# Altium PCB TYPEC_4KTransmitter-v1.0.PcbDoc (part 5 of 12)
Units mil, origin at the board's own origin, x right, y up, seen from the top; angles counter-clockwise.
Board outline 2834.7 x 1259.84 mil, 10 copper layers (Top Layer, GND-1, Signal L1, GND-2, PWR-1, PWR-2, GND-3, Signal L2, GND-4, Bottom Layer), stack 61.686 mil thick; 475 components, 338 nets, 2161 pads, 1240 vias.
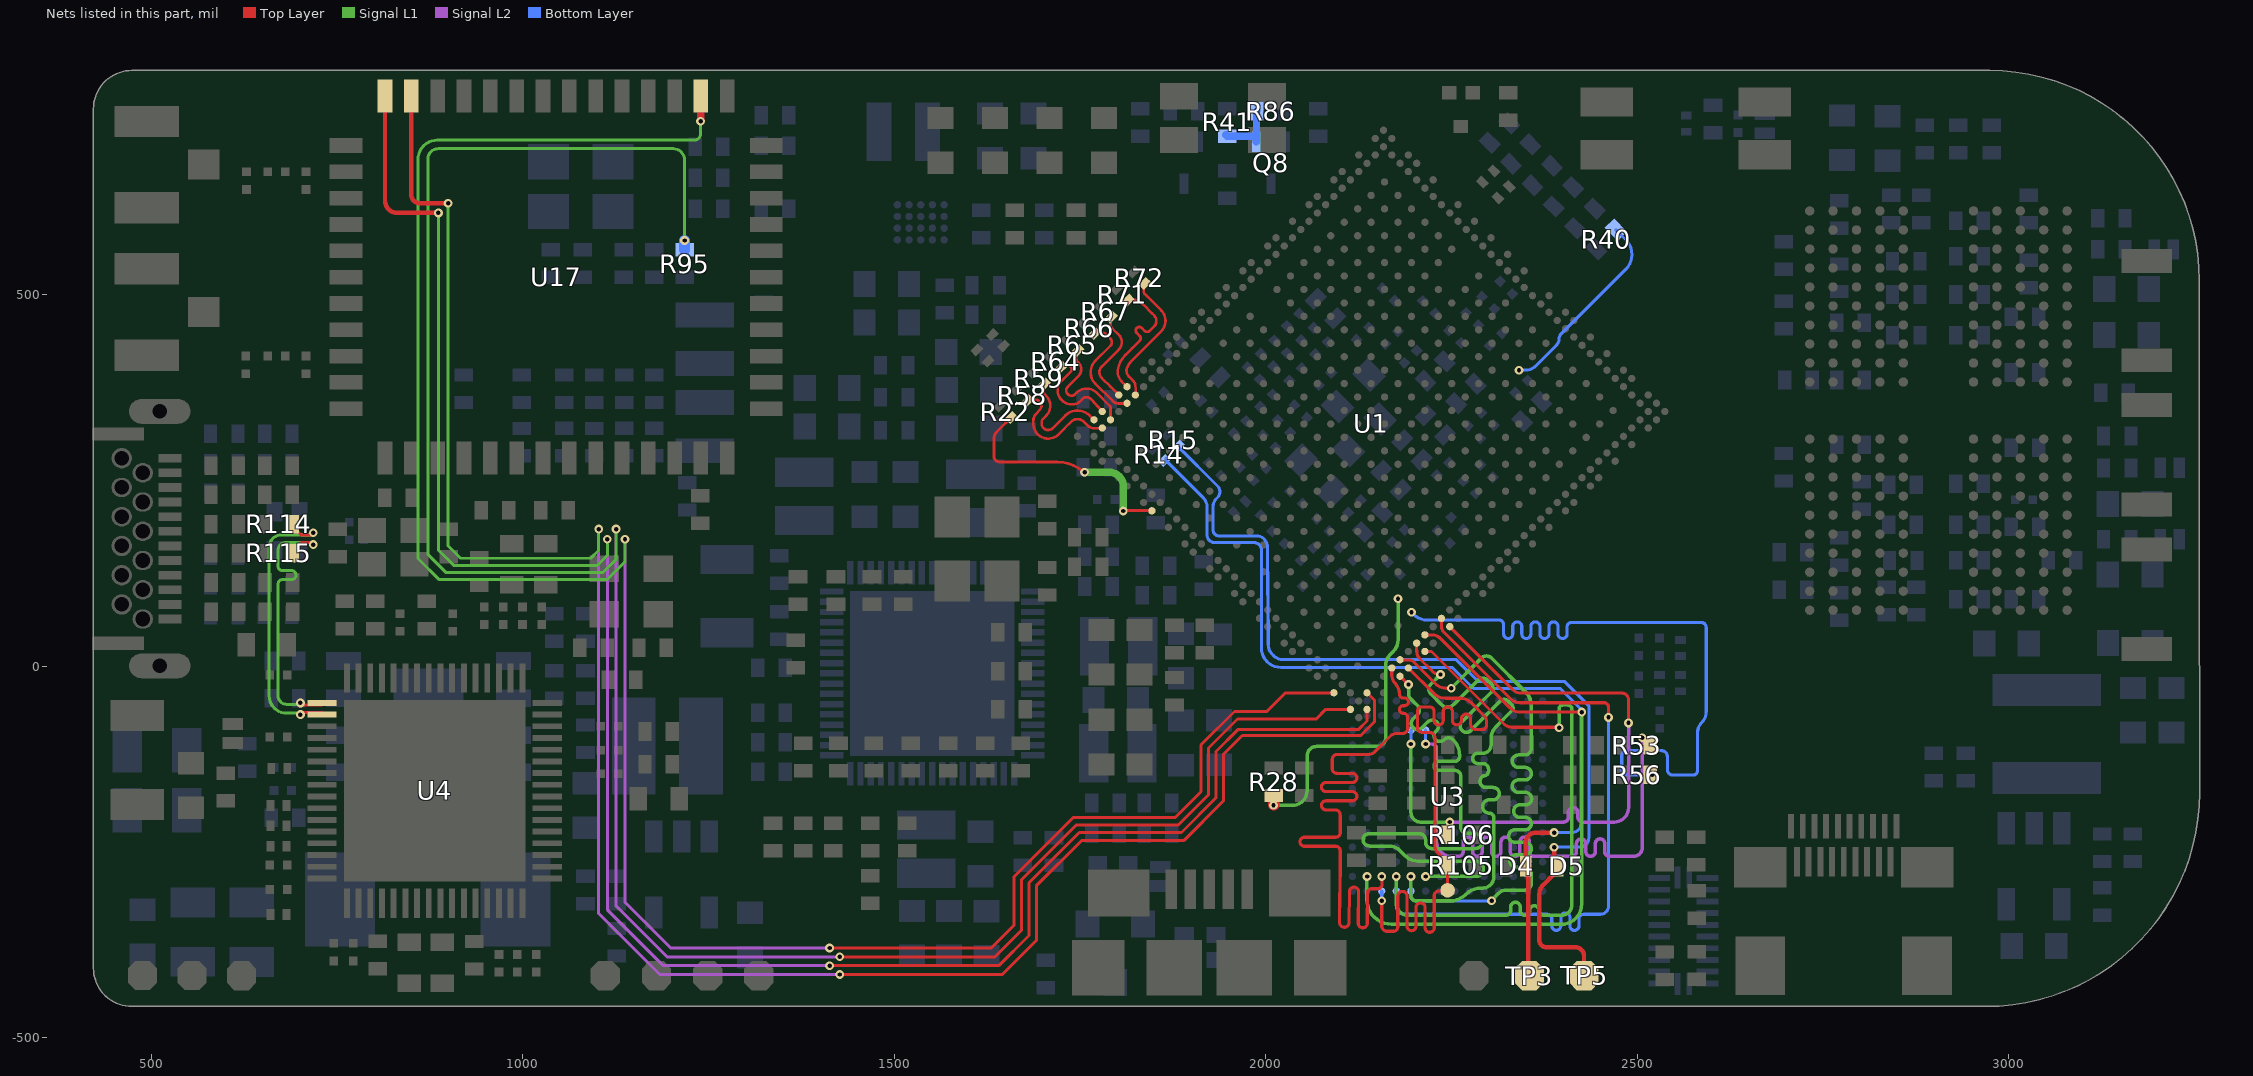
[diagram p11: the nets of this part, all layers, seen from the top]

## Part data (continued)
R135 R136 R137 R138 R139: library part RC0402FR-0730KL, "RES 30K OHM 1% 1/16W 0402", Case Code (Imperial)=0402, Case Code (Metric)=1005, Manufacturer=Yageo, Max Operating Temperature=155°C, Max Power Dissipation=63mW, Min Operating Temperature=-55°C, Power Rating=62.5mW, Resistance=30kR, Resistance Tolerance=1%, Resistor Type="Thick Film", Supplier Part Number 1=603-RC0402FR-0730KL, Temperature Coefficient=100ppm/°C, Voltage Rating=50V, Case/Package=0402, Category="Chip SMD Resistors", ComponentLink1Description=https://datasheet.ciiva.com/7849/1018594-7849957.pdf?src-supplier=Element14, ComponentLink1URL=https://datasheet.ciiva.com/7849/1018594-7849957.pdf?src-supplier=Element14, ComponentLink2Description=https://datasheet.ciiva.com/46394/1018594-46394938.pdf?src-supplier=Element14, ComponentLink2URL=https://datasheet.ciiva.com/46394/1018594-46394938.pdf?src-supplier=Element14, ComponentLink3Description=https://datasheet.ciiva.com/12577/pyu-rc0402-51-rohs-l-6-r-12577743.pdf?src-supplier=Mouser, ComponentLink3URL=https://datasheet.ciiva.com/12577/pyu-rc0402-51-rohs-l-6-r-12577743.pdf?src-supplier=Mouser, Construction=Rectangular, Depth=0.5mm, Features="Moisture Resistant", Height=0.35mm, Lead Free="Lead Free", Length=1mm, Manufacturer Part Number=RC0402FR-0730KL, Military Standard=Not, Number of Terminations=2, Packaging="Tape and Reel", Pricing 1="1=0.10000, 10=0.01200, 50=0.01200, 100=0.00500, 1000=0.00300, 2500=0.00200, 10000=0.00100 (USD)", REACH SVHC=Unknown, RoHS=Yes, RoHS Compliant=Yes, Series=RC, Size Code=0402, Stock 1=684954, Supplier 1=Mouser, Termination=SMD/SMT, Tolerance=1%, Voltage Rating (DC)=50V, Weight=2.3E-05oz, Width=0.5mm
SW1 SW2 SW3: "SWITCH TACTILE SPST-NO 0.05A 12V", Contact Current Rating=50mA, Contact Resistance=100mR, Insulation Resistance=100MR, LCSC Part Number=C231329, Manufacturer=Omron, Max Operating Temperature=70°C, Max Voltage Rating (DC)=12V, Min Operating Temperature=-25°C, Operating Force=1.5N, Package Quantity=1, Ratings="Dust Proof,IP40", Supplier Part Number 1=SW1020DKR-ND, Actuator Length=0.4mm, Actuator Type=Standard, ComponentLink1Description=http://www.farnell.com/datasheets/60838.pdf?src-supplier=Farnell, ComponentLink1URL=http://www.farnell.com/datasheets/60838.pdf?src-supplier=Farnell, ComponentLink2Description=http://www.farnell.com/datasheets/60838.pdf?src-supplier=Element14, ComponentLink2URL=http://www.farnell.com/datasheets/60838.pdf?src-supplier=Element14, ComponentLink3Description=https://omronfs.omron.com/en_US/ecb/products/pdf/en-b3u.pdf?src-supplier=Digi-Key, ComponentLink3URL=https://omronfs.omron.com/en_US/ecb/products/pdf/en-b3u.pdf?src-supplier=Digi-Key, ComponentLink4Description=http://www.omron.com/ecb/products/pdf/en-b3u.pdf?src-supplier=Digi-Key, ComponentLink4URL=http://www.omron.com/ecb/products/pdf/en-b3u.pdf?src-supplier=Digi-Key, ComponentLink5Description=https://www.distrelec.biz/Web/Downloads/he/et/B3U_eng_datasheet.pdf?mime=application%2Fpdf&src-supplier=Distrelec, ComponentLink5URL=https://www.distrelec.biz/Web/Downloads/he/et/B3U_eng_datasheet.pdf?mime=application%2Fpdf&src-supplier=Distrelec, ComponentLink6Description=http://www.onlinecomponents.com/productFiles/mf-OM/en-b3u.pdf?src-supplier=Onlinecomponents.com, ComponentLink6URL=http://www.onlinecomponents.com/productFiles/mf-OM/en-b3u.pdf?src-supplier=Onlinecomponents.com, ComponentLink7Description=https://www.verical.com/server-webapp/html/getDatasheet?partID=552554&src-supplier=Verical, ComponentLink7URL=https://www.verical.com/server-webapp/html/getDatasheet?partID=552554&src-supplier=Verical, ComponentLink8Description=http://www.farnell.com/datasheets/1685550.pdf?src-supplier=Element14, ComponentLink8URL=http://www.farnell.com/datasheets/1685550.pdf?src-supplier=Element14, ComponentLink9Description=http://www.farnell.com/datasheets/2610940.pdf?src-supplier=Farnell, ComponentLink9URL=http://www.farnell.com/datasheets/2610940.pdf?src-supplier=Farnell, ComponentLink10Description=https://www.alliedelec.com/m/d/4c8a9ef82804fc3c241a13c1e298fd73.pdf?src-supplier=Allied+Electronics, ComponentLink10URL=https://www.alliedelec.com/m/d/4c8a9ef82804fc3c241a13c1e298fd73.pdf?src-supplier=Allied+Electronics, Contact Material=Silver, Current Rating=50mA, Depth=2.5mm, Electrical Life=200000Cycles, Height=1.2mm, Illumination Type=Non-Illuminated,Illuminated, Item Type=Switch, Lead Free="Lead Free", Length=4mm, Manufacturer Part Number=B3U-1000P, Max Current Rating=50mA, Mechanical Life=200000Cycles, Mount="Surface Mount", Orientation=Straight, Packaging="Tape and Reel", Pricing 1="1=1, 10=0.961, 25=0.9064, 50=0.7976, 100=0.7251, 250=0.68888, 500=0.67074, 1000=0.52571 (USD)", REACH SVHC=Unknown, Stock 1=116454, Supplier 1=Digi-Key, Switch Function=Off-Mom, Switch Travel=0.15mm, Termination=SMD/SMT, Throw Configuration=SPST, Voltage Rating (DC)=12V, Weight=0.000776oz, Width=3mm
SW4: "SWITCH TACTILE SPST-NO 0.05A 12V", Actuator Color=Black, Contact Current Rating=50mA, Contact Resistance=500mR, LCSC Part Number=C128539, Manufacturer=Panasonic, Max Operating Temperature=70°C, Max Voltage Rating (DC)=12V, Min Operating Temperature=-20°C, Operating Force=2.2N, Package Quantity=4000, Actuator Length=1mm, Category="Tactile Switches", ComponentLink1Description=https://datasheet.ciiva.com/30117/atv0000ce5-30117313.pdf?src-supplier=Onlinecomponents.com, ComponentLink1URL=https://datasheet.ciiva.com/30117/atv0000ce5-30117313.pdf?src-supplier=Onlinecomponents.com, ComponentLink2Description=https://datasheet.ciiva.com/26945/getdatasheetpartid-65575-26945772.pdf?src-supplier=Verical, ComponentLink2URL=https://datasheet.ciiva.com/26945/getdatasheetpartid-65575-26945772.pdf?src-supplier=Verical, ComponentLink3Description=https://datasheet.ciiva.com/7987/1679731-7987639.pdf?src-supplier=Element14, ComponentLink3URL=https://datasheet.ciiva.com/7987/1679731-7987639.pdf?src-supplier=Element14, ComponentLink4Description=https://datasheet.ciiva.com/8165/atv0000ce5-8165244.pdf?src-supplier=Avnet, ComponentLink4URL=https://datasheet.ciiva.com/8165/atv0000ce5-8165244.pdf?src-supplier=Avnet, ComponentLink5Description=https://datasheet.ciiva.com/2899/atv0000ce5-2899804.pdf?src-supplier=Digikey, ComponentLink5URL=https://datasheet.ciiva.com/2899/atv0000ce5-2899804.pdf?src-supplier=Digikey, ComponentLink6Description=https://datasheet.ciiva.com/2899/atv0000ce5-2899805.pdf?src-supplier=Digikey, ComponentLink6URL=https://datasheet.ciiva.com/2899/atv0000ce5-2899805.pdf?src-supplier=Digikey, ComponentLink7Description=https://datasheet.ciiva.com/2899/atv0000ce5-2899803.pdf?src-supplier=Digikey, ComponentLink7URL=https://datasheet.ciiva.com/2899/atv0000ce5-2899803.pdf?src-supplier=Digikey, Current Rating=50mA, Depth=4.5mm, Electrical Life=100000Cycles, Illumination Type=Non-Illuminated,Illuminated, Item Type="Tactile Switch", Length=6.4mm, Manufacturer Part Number=EVQ-PUA02K, Max Current Rating=50mA, Mechanical Life=100000Cycles, Mounting Technology="Surface Mount", Number of Positions=2NUMBER, Orientation=Straight, Packaging="Tape and Reel", Pricing="1=0.52, 10=0.461, 50=0.461, 100=0.384, 1000=0.335, 10000=0.283 (USD)", Radiation Hardening=No, RoHS=Yes, RoHS Compliant=Yes, Series=EVQPU, Stock=6621, Supplier=Mouser, Switch Function=Off-Mom, Switch Travel=0.3mm, Termination="Gull Wing", Throw Configuration=SPST, Voltage Rating (DC)=12V
TP1 TP2 TP3 TP5 TP6 TP7 TP10 TP11 TP12 TP14: "Test Point ON", Item Type="Test Point", Manufacturer Part Number="TEST POINT 0.5mm Dia"
U1: "BGA-565(15.5x14.4) Microcontrollers (MCU/MPU/SOC) ROHS", LCSC Part Number=C2943786, Manufacturer=Rockchip, Package=BGA-565(15.5x14.4), ComponentLink1Description=LCSC, ComponentLink1URL=https://www.lcsc.com/product-detail/Microcontrollers-MCU-MPU-SOC_Rockchip-RK3566_C2943786.html, Item Type=IC, Manufacturer Part Number=RK3566
U2: "IC INTERFACE SPECIALIZED 24UQFN", Manufacturer="Texas Instruments", Supplier Part Number=595-TPD12S016RKTR, Category="Interface ICs", ComponentLink1Description=https://datasheet.ciiva.com/12545/tpd12s016-108314-12545332.pdf?src-supplier=Mouser, ComponentLink1URL=https://datasheet.ciiva.com/12545/tpd12s016-108314-12545332.pdf?src-supplier=Mouser, ComponentLink2Description=https://datasheet.ciiva.com/14195/tpd12s016-14195158.pdf?src-supplier=Avnet, ComponentLink2URL=https://datasheet.ciiva.com/14195/tpd12s016-14195158.pdf?src-supplier=Avnet, ComponentLink3Description=https://datasheet.ciiva.com/6632/tpd12s016-6632086.pdf?src-supplier=Digikey, ComponentLink3URL=https://datasheet.ciiva.com/6632/tpd12s016-6632086.pdf?src-supplier=Digikey, Manufacturer Part Number=TPD12S016RKTR, Pricing="1=0.82, 10=0.694, 50=0.694, 100=0.537, 1000=0.443, 10000=0.442 (USD)", RoHS=Yes, Stock=5223, Supplier=Mouser
U3: "eMMC 5.1 FBGA-153 eMMC ROHS", LCSC Part Number=C499919, Manufacturer=Samsung, Package=FBGA-153, ComponentLink1Description=LCSC, ComponentLink1URL=https://www.lcsc.com/product-detail/eMMC_Samsung-KLMAG1JETD-B041_C499919.html, Item Type=IC, Manufacturer Part Number=KLMAG1JETD-B041
U4: "5.4Gbps Type-C/DP/eDPToDual-port MIPI DSI/CSI/LVDS with Audio QFN-64(7.5x7.5) Video Interface ICs ROHS", LCSC Part Number=C5310990, Manufacturer="LONTIUM SEMICONDUCTOR", Package=QFN-64(7.5x7.5), ComponentLink1Description=LCSC, ComponentLink1URL=https://jlcpcb.com/partdetail/LontiumSemiconductor-LT7911D/C5310990, Item Type=IC, Manufacturer Part Number=LT7911D
U5: "Step-down type CSP1.56*1.96-20 DC-DC Converters ROHS", LCSC Part Number=C178249, Manufacturer=Silergy, Manufacturer Part Number=SYR838PKC, RoHS=Yes, Supplier 1=Avnet, Supplier Part Number 1=SYR838PKC
U6: "Step-down type 3.8V~36V 5A ESOP-8 DC-DC Converters ROHS", LCSC Part Number=C509400, Manufacturer=SCT, Item Type=IC, Manufacturer Part Number=SCT2450STER, RoHS=No, Supplier=LCSC
U7: "QFN-68-EP(7x7) Power Management Specialized - PMIC ROHS", LCSC Part Number=C2939628, Manufacturer=Rockchip, Package=QFN-68-EP(7x7), ComponentLink1Description=LCSC, ComponentLink1URL=https://www.lcsc.com/product-detail/Power-Management-Specialized-PMIC_Rockchip-RK809-5_C2939628.html, Item Type=IC, Manufacturer Part Number=RK809-5
U8: "IC CURRENT SWITCH SOT23-3", LCSC Part Number=C500764, Manufacturer=Diodes, Supplier Part Number=AP2331SA-7DICT-ND, Category="Hot Swap Controllers", ComponentLink1Description=https://datasheet.ciiva.com/15108/getdatasheetpartid-670771-15108880.pdf?src-supplier=Verical, ComponentLink1URL=https://datasheet.ciiva.com/15108/getdatasheetpartid-670771-15108880.pdf?src-supplier=Verical, ComponentLink2Description=https://datasheet.ciiva.com/4923/ap2331-6844-4923636.pdf?src-supplier=Mouser, ComponentLink2URL=https://datasheet.ciiva.com/4923/ap2331-6844-4923636.pdf?src-supplier=Mouser, ComponentLink3Description=https://datasheet.ciiva.com/8142/ap2331-8142774.pdf?src-supplier=Avnet, ComponentLink3URL=https://datasheet.ciiva.com/8142/ap2331-8142774.pdf?src-supplier=Avnet, ComponentLink4Description=https://datasheet.ciiva.com/1962/ap2331-1962167.pdf?src-supplier=Digikey, ComponentLink4URL=https://datasheet.ciiva.com/1962/ap2331-1962167.pdf?src-supplier=Digikey, ComponentLink5Description=https://datasheet.ciiva.com/1962/ap2331-1962168.pdf?src-supplier=Digikey, ComponentLink5URL=https://datasheet.ciiva.com/1962/ap2331-1962168.pdf?src-supplier=Digikey, ComponentLink6Description=https://datasheet.ciiva.com/1962/ap2331-1962169.pdf?src-supplier=Digikey, ComponentLink6URL=https://datasheet.ciiva.com/1962/ap2331-1962169.pdf?src-supplier=Digikey, Item Type=IC, Manufacturer Part Number=AP2331SA-7, Pricing="1=0.45, 10=0.383, 25=0.3572, 100=0.2859, 250=0.26548, 500=0.22464, 1000=0.17359 (USD)", RoHS=Yes, Stock=19607, Supplier=Digikey
U11: "Step-down type SOT-23-5 DC-DC Converters ROHS", LCSC Part Number=C78988, Manufacturer=Silergy, ComponentLink1Description=LCSC, ComponentLink1URL=https://www.lcsc.com/product-detail/DC-DC-Converters_Silergy-Corp-SY8089AAAC_C78988.html, Item Type=IC, Manufacturer Part Number=SY8089AAAC, RoHS=No, Supplier 1=LCSC, Supplier Part Number 1=C78988
U12: "FBGA-200 DDR SDRAM ROHS", LCSC Part Number=C2920249, Manufacturer=Samsung, Item Type=IC, Manufacturer Part Number=K4U6E3S4AA-MGCL, Pricing="1=9.1076, 10=7.9029, 30=7.1674, 128=6.5516 (USD)", RoHS=No, Stock=962, Supplier=LCSC
U16: "IC REG BUCK ADJ 2A SOT23-5", LCSC Part Number=C141836, Manufacturer="Texas Instruments", ComponentLink1Description=http://www.ti.com/lit/ds/symlink/tlv62569.pdf?src-supplier=Farnell, ComponentLink1URL=http://www.ti.com/lit/ds/symlink/tlv62569.pdf?src-supplier=Farnell, ComponentLink2Description=http://www.ti.com/lit/ds/symlink/tlv62569.pdf?src-supplier=Digikey, ComponentLink2URL=http://www.ti.com/lit/ds/symlink/tlv62569.pdf?src-supplier=Digikey, Item Type=IC, Manufacturer Part Number=TLV62569DBVR, Pricing="1=0.47, 10=0.248, 50=0.248, 100=0.143, 1000=0.12, 10000=0.086 (USD)", RoHS=Yes, Stock=6385, Supplier=Mouser
U17: "-86dBm 14dBm 2.4GHz - WiFi Modules ROHS", LCSC Part Number=C2918717, Manufacturer="AMPAK Tech", Package=Custom, ComponentLink1Description=LCSC, ComponentLink1URL=https://www.lcsc.com/product-detail/WiFi-Modules_AMPAK-Tech-AP6275S_C2918717.html, Item Type=Module, Manufacturer Part Number=AP6275S
X1: library part XDMCZLNDDF-0.032768MHZ, "32.768kHz 贴片晶振 12.5pF ±20ppm ±20ppm SMD3215-2P Crystals ROHS", LCSC Part Number=C521573, Manufacturer="TAITIEN Elec", Package=SMD3215-2P, ComponentLink1Description=LCSC, ComponentLink1URL=https://www.lcsc.com/product-detail/Crystals_TAITIEN-Elec-XDMCZLNDDF-0-032768MHZ_C521573.html, Item Type=Crystal, Manufacturer Part Number=XDMCZLNDDF-0.032768MHZ
X2: library part X322524MOB4SI, "24MHz SMD Crystal Resonator 12pF ±10ppm ±30ppm -40℃~+85℃ SMD3225-4P Crystals ROHS", LCSC Part Number=C70590, Manufacturer="Yangxing Tech", ComponentLink1Description=LCSC, ComponentLink1URL=https://www.lcsc.com/product-detail/Crystals_Yangxing-Tech-X322524MOB4SI_C70590.html, Item Type=Crystal, Manufacturer Part Number=X322524MOB4SI
X3: library part Q22FA12800078, "37.4MHz SMD Crystal Resonator 9pF 60Ω ±10ppm -40℃~+85℃ SMD2016-4P Crystals", LCSC Part Number=C255897, Manufacturer=Seiko, ComponentLink1Description=LCSC, ComponentLink1URL=https://www.lcsc.com/product-detail/Crystals_Seiko-Epson-Q22FA12800078_C255897.html, Manufacturer Part Number=Q22FA12800078
X4: library part NX2520SA-27MHZ-STD-CSW-5, "SMD2520-4P Crystals ROHS", Case/Package=SMD/SMT, ESR (Equivalent Series Resistance)=70kR, Frequency=32.768kHz, Frequency Tolerance=20ppm, LCSC Part Number=C910047, Load Capacitance=6pF, Manufacturer=NDK, Max Operating Temperature=85°C, Min Operating Temperature=-40°C, Supplier Part Number 1=1847854, Category=Crystals, Item Type=Crystal, Manufacturer Part Number=NX2520SA-27MHZ-STD-CSW-5, Mounting Technology="Surface Mount", Packaging="Cut Tape", Pricing 1="5=0.15520, 50=0.68600, 100=0.66600, 250=0.65000, 500=0.63400 (GBP)", RoHS=Yes, RoHS Compliant=Yes, Series=NX3215SA, Stock 1=500, Supplier 1=Rs
X5: library part SX3M32.768KD10F20TLN, "1.8V ±10ppm ±20ppm CMOS 32.768kHz SMD3225-4P Crystal Oscillators ROHS", LCSC Part Number=C21547574, Manufacturer="Shenzhen SCTF Elec", Package=SMD3225-4P, ComponentLink1Description=LCSC, ComponentLink1URL=https://www.lcsc.com/product-detail/Crystal-Oscillators_Shenzhen-SCTF-Elec-SX3M32-768KD10F20TLN_C21547574.html, Item Type="Crystal Oscillator", Manufacturer Part Number=SX3M32.768KD10F20TLN

## Free pads (board coordinates)
  round 19.68 smd: 2(2244.94,-301.97)

## Via types
v1: diameter 11.81, hole 5.91, Top Layer to Bottom Layer, tented both sides, 710 vias
v2: diameter 15.75, hole 7.87, Top Layer to Bottom Layer, tented both sides, 265 vias
v3: diameter 11.81, hole 5.91, Top Layer to Signal L1, tented both sides, 146 vias
v4: diameter 11.81, hole 5.91, Signal L2 to Bottom Layer, 60 vias
v5: diameter 11.81, hole 5.91, Signal L1 to Signal L2, 38 vias
v6: diameter 11.81, hole 5.91, Top Layer to Signal L1, 16 vias
v7: diameter 11.81, hole 5.91, Top Layer to Bottom Layer, 4 vias
v8: diameter 11.81, hole 5.91, Signal L1 to Signal L2, tented both sides, 1 vias

## Nets (pads, with @x,y where several pads share a name; then routed paths per layer and width w, separated by ;. In a path a pad name is that pad's centre, name@x,y a point inside that pad or via, vN(x,y) a via of type N, cw(c..) or ccw(c..) an arc to the next point about the centre after c; other vN are vias at no path point)
#HDMI_TX0_N: R67.1 U1.AR33 | length 127.3
  Top Layer w3.5: 1776.83,398.55 ccw(c1787.82,395.15) 1776.33,395.69 ccw(c1787.82,395.15) 1776.32,395.39 ccw(c1787.82,395.15) 1776.32,395.28 ccw(c1786.84,395.28) 1779.4,387.85 1791.73,375.52 1792.26,374.99 ; 1776.92,398.82 cw(c1787.82,395.15) 1779.69,403.29 1802.53,426.13 ccw(c1792.64,436.01) 1806.62,436.01 ccw(c1793.57,436.01) 1802.81,445.23 1794.11,453.93 cw(c1800.9,460.73) 1793.72,454.34 cw(c1800.9,460.73) 1792.27,456.49 cw(c1800.9,460.73) 1791.29,460.73 cw(c1812.56,463.44) 1791.12,463.37 R67.1@1791.12,463.44 ; 1791.02,376.19 U1.AR33@1802.41,364.8
#HDMI_TX0_P: R66.1 U1.AP33 | length 151.6
  Top Layer w3.5: R66.1@1770.01,447.37 1771.4,448.76 1776.44,448.76 1776.53,448.67 1779.8,448.67 cw(c1779.8,440.78) 1785.39,446.36 1791.18,440.57 cw(c1786.42,435.81) 1791.18,431.04 1770.5,410.36 ccw(c1785.22,395.95) 1767.07,405.69 ccw(c1785.22,395.95) 1764.64,395.12 1764.65,394.97 1764.68,394.08 ccw(c1784.16,394.33) 1770.43,380.51 1794.3,356.65 ccw(c1802.41,364.8) 1801.59,353.33 1813.21,353.33 U1.AP33@1813.55,353.66
#HDMI_TX1_N: R65.1 U1.AP35 | length 157.1
  Top Layer w3.5: R65.1@1747.51,424.87 ccw(c1753.13,419.25) 1745.18,419.25 1745.18,414.57 ccw(c1752.91,414.57) 1747.45,409.1 1747.96,408.59 ; 1748.1,408.46 cw(c1738.64,399.33) 1747.77,389.86 1733.5,375.59 ccw(c1738.12,370.89) 1731.53,370.99 ccw(c1738.65,371.11) 1733.56,366.12 ccw(c1739.18,371.65) 1739.02,363.77 ccw(c1739.06,367.27) 1739.31,363.78 ccw(c1738.75,370.58) 1743.57,365.75 1745.79,367.97 cw(c1758.48,355.28) 1758.48,373.22 1760.03,373.22 cw(c1760.03,356.11) 1772.13,368.21 1790.25,350.09 cw(c1787.77,347.61) 1791.27,347.61 U1.AP35@1791.27,331.39
#HDMI_TX1_P: R64.1 U1.AR35 | length 134.2
  Top Layer w3.5: 1720.03,370.66 ccw(c1738.65,371.11) 1725.45,357.97 ; 1720.03,370.89 cw(c1738.12,370.89) 1725.33,383.68 1731.6,389.95 1737.83,396.18 ; R64.1@1725.01,402.37 cw(c1729.45,397.93) 1729.45,404.21 1733.78,404.21 cw(c1733.78,398.33) 1737.94,402.49 cw(c1734.77,399.32) 1739.24,399.6 cw(c1734.41,399.6) 1737.87,396.22 ; 1725.48,357.94 ccw(c1739.2,371.65) 1739.2,352.25 1740.24,352.25 ccw(c1740.24,366.98) 1750.65,356.57 1753.57,359.48 cw(c1758.97,354.09) 1758.97,361.72 cw(c1758.97,353.56) 1763.17,360.56 cw(c1758.97,353.56) 1764.75,359.33 U1.AR35@1780.14,342.53
#HDMI_TX2_N: R59.1 U1.AR36 | length 149.5
  Top Layer w3.5: 1701.45,319.92 cw(c1708.84,327.18) 1699.34,331.29 1704.93,337.35 1705.38,337.82 ccw(c1692.41,350.23) 1705.61,362.39 1704.63,363.46 1702.91,365.32 cw(c1705.47,367.7) 1702.46,365.91 cw(c1710.73,370.74) 1701.16,370.74 1701.16,373.4 1701.12,373.44 1701.12,378.48 R59.1@1702.51,379.87 ; 1701.57,319.82 ccw(c1707.35,326.22) 1711.41,318.61 1712.09,318.97 ccw(c1710.43,322.05) 1712.89,319.56 1730.57,337.24 cw(c1746.58,321.23) 1746.6,343.87 cw(c1746.58,319.87) 1750.65,343.53 1753.02,343.13 cw(c1746.82,320.79) 1763.21,337.18 U1.AR36@1769,331.39
#HDMI_TX2_P: R58.1 U1.AP36 | length 169.3
  Top Layer w3.5: R58.1@1680.01,357.1 1685.05,357.1 1686.54,358.58 1690.35,358.58 cw(c1690.35,351.97) 1695.02,356.65 ; 1695.02,356.65 1696.96,354.71 cw(c1690.49,350.19) 1696.96,345.66 1690.89,339.09 ccw(c1699.34,331.29) 1688.75,335.78 ccw(c1708.84,327.18) 1693.34,311.77 ccw(c1697.4,315.84) 1693.41,311.71 ccw(c1703.93,322.4) 1693.69,311.44 ccw(c1697.65,315.6) 1693.75,311.38 ccw(c1707.35,326.22) 1716.82,308.46 1717.49,308.82 ccw(c1710.43,322.05) 1720.99,311.4 1729.55,319.96 ; 1729.61,320.01 1738.7,329.11 cw(c1746.58,321.23) 1746.58,332.37 cw(c1746.58,319.87) 1755.41,328.72 1758.45,325.68 1760.94,323.19 ccw(c1768.97,331.32) 1768.97,319.89 U1.AP36@1780.14,320.26
#HDMI_TXCLK_N: R72.1 U1.AP32 | length 185.8
  Top Layer w3.5: 1821.6,384.14 1821.3,384.44 1817.02,388.71 1816.18,389.56 cw(c1824.74,398.04) 1812.69,397.61 cw(c1816.19,397.68) 1812.78,398.46 cw(c1837.52,392.55) 1815.79,405.77 cw(c1837.52,392.55) 1819.58,410.58 1859.17,450.17 ccw(c1844.49,464.88) 1865.28,464.86 ccw(c1846.33,464.88) 1859.73,478.29 1840.22,497.79 1837.54,500.47 cw(c1841.68,504.61) 1835.83,504.59 1835.83,508.15 1836.12,508.44 1835.83,508.73 R72.1@1837.51,514.87 ; 1821.62,384.12 cw(c1813.55,375.93) 1821.73,384.01 cw(c1813.55,375.93) 1824.71,378.69 cw(c1821.31,377.87) 1824.8,378.04 1825.04,372.99 cw(c1821.55,372.82) 1825.05,372.82 1825.05,371.17 U1.AP32@1824.68,364.8
#HDMI_TXCLK_P: R71.1 U1.AR32 | length 185.6
  Top Layer w3.5: U1.AR32@1813.55,375.93 1806.18,383.16 cw(c1819.13,396.11) 1800.82,396.11 1800.82,398.21 cw(c1838.25,391.81) 1811.41,418.67 1820.06,427.32 1830.47,437.73 ccw(c1827.11,441.09) 1830.47,444.45 1826.72,448.21 cw(c1830.08,451.56) 1826.72,454.92 cw(c1830.08,451.56) 1833.44,454.92 1837.19,451.17 ccw(c1840.55,454.53) 1843.91,451.17 1850.17,457.43 1850.61,457.9 ccw(c1843.1,464.51) 1851.66,459.33 ccw(c1843.1,464.51) 1851.86,459.69 ccw(c1843.1,464.5) 1850.17,471.58 1847.24,474.5 1835.48,486.27 1835.16,486.59 ccw(c1817.77,468.92) 1821.16,493.48 R71.1@1815.01,492.37
AUX_N: R114.1 U4.18 | length 401.7
  Top Layer w4.1: R114.1@690.09,190.99 690.1,187.49 697.04,180.54 697.51,180.54 701.66,176.39 718.1,176.39 v3(718.1,179.25) ; v3(700.96,-65.44) 700.96,-62.59 729.93,-62.59 U4.18@729.93,-65.42
  Signal L1 w4: v3(700.96,-65.44) ccw(c699.05,-65.44) 699.05,-63.54 682.45,-63.54 cw(c682.45,-39.9) 658.81,-39.9 658.81,159.95 cw(c675.19,159.95) 675.19,176.34 718.1,176.34 v3(718.1,179.25)
AUX_P: R115.1 U4.17 | length 401.7
  Top Layer w4.1: R115.1@690.09,151.69 690.09,155.19 697.04,162.14 697.45,162.14 701.61,166.29 718.1,166.29 v3(718.1,163.44) ; v3(700.96,-49.63) 700.96,-52.49 729.93,-52.49 U4.17@729.93,-49.67
  Signal L1 w4: v3(700.96,-49.63) cw(c699.05,-49.63) 699.05,-51.54 682.45,-51.54 cw(c682.45,-39.9) 670.81,-39.9 670.81,96.39 670.81,110.39 cw(c676.81,110.39) 676.81,116.39 689.12,116.39 ccw(c689.12,122.39) 689.12,128.39 676.81,128.39 cw(c676.81,134.39) 670.81,134.39 670.81,155.81 cw(c681.34,155.81) 681.34,166.34 718.1,166.34 v3(718.1,163.44)
BT_HOST_WAKE: U1.A37 U17.50 | length 2721.2
  Top Layer w4: v1(1413.13,-403.36) 1640.69,-403.36 1681.47,-362.59 1681.47,-291.79 1749.32,-223.94 1886.7,-223.94 1933.18,-177.46 1933.18,-114.95 1962.47,-85.66 2124.78,-85.66 2136.48,-73.97 U1.A37@2136.48,-58.35
  Top Layer w6: U17.50@814.78,767.13 814.78,626.3 ccw(c831.18,626.3) 831.18,609.9 v3(886.6,609.9)
  Signal L1 w4: v3(886.6,609.9) 886.6,156.17 907.28,135.49 1100.78,135.49 1113.96,148.66 v5(1113.96,170.46)
  Signal L2 w4: v5(1113.96,170.46) 1113.96,-327.98 1189.35,-403.36 v1(1413.13,-403.36)
BT_REG_ON: U1.D38 U17.38 | length 3004.5
  Top Layer w4: v1(1413.13,-379.55) 1630.83,-379.55 1661.47,-348.91 1661.47,-283.51 1741.03,-203.94 1878.42,-203.94 1913.18,-169.18 1913.18,-106.15 1958.14,-61.19 2001.61,-61.19 2026.72,-36.08 U1.D38@2091.93,-36.08
  Top Layer w6: U17.38@1239.56,766.72 U17.38@1239.98,767.13
  Top Layer w10: v3(1239.56,733.36) U17.38@1239.56,766.72
  Signal L1 w4: v5(1137.77,170.46) 1137.77,140.34 1113.61,116.18 887.86,116.18 859.21,144.83 859.21,682.07 cw(c884.86,682.07) 861.67,693.04 cw(c884.86,682.07) 873.89,705.26 cw(c884.86,682.07) 884.86,707.73 1231.13,707.73 ccw(c1231.13,716.16) 1234.32,708.35 ccw(c1231.13,716.16) 1238.94,712.98 ccw(c1231.13,716.16) 1239.56,716.16 v3(1239.56,733.36)
  Signal L2 w4: v5(1137.77,170.46) 1137.77,-318.11 1199.21,-379.55 v1(1413.13,-379.55)
BT_WAKE: U1.B36 U17.49 | length 2752.7
  Top Layer w4: v1(1426.96,-415.27) 1645.62,-415.27 1691.47,-369.42 1691.47,-295.93 1752.31,-235.08 1889.7,-235.08 1943.18,-181.6 1943.18,-119.09 1968.61,-93.66 2128.1,-93.66 2146.9,-74.86 2146.9,-46.5 U1.B36@2136.48,-36.08
  Top Layer w6: U17.49@850.21,767.13 850.21,634.4 ccw(c861.73,634.4) 861.73,622.88 v3(899.73,622.88)
  Signal L1 w4: v3(899.73,622.88) 899.73,161.61 916.31,145.04 1091.71,145.04 1102.05,155.37 1102.05,183.95 v5(1102.39,184.29)
  Signal L2 w4: v5(1102.39,184.29) 1102.05,183.95 1102.05,-332.91 1184.41,-415.27 v1(1426.96,-415.27)
CLK32K_OUT1_WIFI: R95.1 U1.B38 | length 3065
  Top Layer w4: v1(1426.96,-391.46) 1635.76,-391.46 1671.47,-355.75 1671.47,-287.65 1745.18,-213.94 1882.56,-213.94 1923.18,-173.32 1923.18,-110.29 1962.28,-71.19 2068.19,-71.19 2081.03,-58.35 U1.B38@2114.21,-58.35
  Signal L1 w4: v5(1125.86,184.29) 1125.86,143.72 1108.29,126.15 896.53,126.15 872.39,150.29 872.39,682.07 cw(c886.6,682.07) 873.63,687.87 cw(c886.6,682.07) 880.8,695.04 cw(c886.6,682.07) 886.6,696.28 1202.89,696.28 cw(c1202.89,681.19) 1217.98,681.19 v1@1217.98,572.92
  Signal L2 w4: v5(1125.86,184.29) 1125.86,-323.04 1194.28,-391.46 v1(1426.96,-391.46)
  Bottom Layer w15: R95.1@1217.98,560.23 v1(1217.98,572.73)
DDR_RZQ: R40.1 U1.1F3 | length 266.6
  Bottom Layer w4.1: v1(2341.09,398.21) 2341.16,398.28 2349.68,398.28 ccw(c2349.68,418.63) 2364.07,404.24 2391.5,431.67 ccw(c2382.96,440.2) 2395.03,440.2 2395.03,440.37 cw(c2404.57,440.4) 2397.83,447.15 2485.25,534.57 ccw(c2466.38,553.43) 2493.06,553.47 ccw(c2463.77,553.44) 2484.48,574.15 R40.1@2471.44,587.19
DEBUG_RX: D4.1 R14.1 TP3.1 | length 1230.7
  Top Layer w6: TP3.1@2354.83,-416.77 2353.72,-400.09 2353.72,-280.35 D4.1@2349.99,-269.57 2349.99,-237.95 cw(c2363.75,-237.95) 2363.75,-224.19 v1(2388.35,-224.19)
  Bottom Layer w4.1: R14.1@1865.89,279.7 ccw(c1873.62,279.7) 1868.14,274.24 1915.96,226.42 cw(c1903.66,214.12) 1921.06,214.12 1921.06,176.75 ccw(c1931.78,176.75) 1931.78,166.02 1984.72,166.02 cw(c1984.72,156.33) 1994.41,156.33 1994.41,24.15 ccw(c2020.47,24.15) 2020.47,-1.91 2251.37,-1.91 2279.72,-30.26 2396.64,-30.26 2424.28,-57.9 2424.28,-212.36 cw(c2412.45,-212.36) 2412.45,-224.19 v1@2390.35,-224.19
DEBUG_TX: D5.1 R15.1 TP5.1 | length 1288.5
  Top Layer w4: D5.1@2387.8,-269.57 D5.1@2388.35,-269.02
  Top Layer w6: D5.1@2388.35,-269.02 v1(2388.35,-243.86) ; D5.1@2392.8,-269.57 2387.96,-280.35 2373.34,-294.97 ccw(c2385.1,-306.71) 2368.48,-306.79 2368.48,-369.19 ccw(c2377.89,-369.19) 2377.89,-378.6 2416.99,-378.6 cw(c2416.99,-390.2) 2428.59,-390.2 TP5.1@2428.59,-416.77
  Bottom Layer w4: v1(2388.35,-243.86) 2422.54,-243.87
  Bottom Layer w4.1: R15.1@1883.06,296.1 1883.06,294.53 1935.24,242.35 cw(c1927.51,234.62) 1938.44,234.62 cw(c1927.51,234.62) 1935.25,226.91 1933.91,225.57 ccw(c1944.84,214.63) 1929.38,214.63 1929.38,182.9 ccw(c1937.12,182.9) 1937.12,175.16 1987.63,175.16 cw(c1987.63,160.34) 2002.45,160.37 2002.51,159.69 2003.56,29.63 ccw(c2024.72,29.63) 2003.56,29.29 ccw(c2024.72,29.63) 2015.9,10.39 ccw(c2024.72,29.63) 2020.13,8.97 ccw(c2024.72,29.63) 2024.72,8.47 2256.82,8.47 2285.91,-20.63 2402.15,-20.63 2435.08,-53.56 2435.08,-231.34 cw(c2422.54,-231.34) 2422.54,-243.87
DIY_LED: Q8.1 R41.1 R86.2 | length 90.5
  Bottom Layer w10: R41.1@1946.41,714.98 R41.1@1948.16,713.23 1986.56,713.23 1987.47,712.32 Q8.1@1987.47,705.5 1987.81,705.84 1987.81,746.38 R86.2@1988.16,746.73
eMMC_CLK: R53.1 U3.M6 | length 840.7
  Signal L2 w4.7: v1(2215.33,-104.98) 2224.01,-104.98 cw(c2224.01,-110.83) 2229.86,-110.83 2229.86,-235.85 ccw(c2250.12,-235.85) 2250.12,-256.12 2259.65,-256.12 ccw(c2259.65,-249.77) 2266,-249.77 2266,-236.59 cw(c2272.35,-236.59) 2278.7,-236.59 2278.7,-249.88 ccw(c2285.05,-249.88) 2291.4,-249.88 2291.4,-236.59 cw(c2297.75,-236.59) 2304.1,-236.59 2304.1,-249.88 ccw(c2310.45,-249.88) 2316.8,-249.88 2316.8,-236.59 cw(c2323.15,-236.59) 2329.5,-236.59 2329.5,-249.88 ccw(c2335.85,-249.88) 2342.2,-249.88 2342.2,-236.59 cw(c2348.55,-236.59) 2354.9,-236.59 2354.9,-249.77 ccw(c2361.25,-249.77) 2361.25,-256.12 2412.05,-256.12 ccw(c2412.05,-249.77) 2418.4,-249.77 2418.4,-239.03 cw(c2424.75,-239.03) 2431.1,-239.03 2431.1,-249.88 ccw(c2437.45,-249.88) 2443.8,-249.88 2443.8,-239.03 cw(c2450.15,-239.03) 2456.5,-239.03 2456.5,-249.77 ccw(c2462.85,-249.77) 2462.85,-256.12 2495.71,-256.12 ccw(c2495.71,-244.98) 2506.85,-244.98 v1@2506.85,-96.43
  Bottom Layer w4.2: v1@2215.25,-104.59 U3.M6@2215.25,-86.47
  other v1: 2506.85,-96.67
eMMC_CMD: R106.2 U1.A27 U3.M5 | length 874
  Top Layer w4.2: U1.A27@2247.83,53 2332.82,-31.99 ccw(c2343.81,-21.04) 2343.78,-36.55 2464.38,-36.55 2479.75,-36.57 ; 2479.79,-36.57 cw(c2479.8,-45.21) 2488.44,-45.19 ; v1@2488.44,-73.58 2488.44,-45.22
  Signal L1 w4.7: v1(2195.64,-104.98) 2195.64,-197.32 ccw(c2208.3,-197.32) 2208.3,-209.97 v1(2247.91,-209.98)
  Signal L2 w4.7: v1(2247.91,-209.98) 2401.22,-209.98 ccw(c2401.22,-203.63) 2407.57,-203.63 2407.57,-197.04 cw(c2413.92,-197.04) 2420.27,-197.04 2420.27,-203.16 ccw(c2427.08,-203.16) 2427.08,-209.98 2469.35,-209.98 ccw(c2469.35,-190.86) 2488.47,-190.86 v1(2488.47,-76.6)
  Bottom Layer w4.2: v1(2195.64,-104.98) U3.M5@2195.64,-86.39
eMMC_DATA0: pad.2 R105.2 U1.A32 U3.A3 | length 938.3
  Top Layer w4.2: v1(2156.31,-315.82) 2156.31,-349.75 ccw(c2163.59,-349.75) 2163.59,-357.02 2172.07,-357.02 ccw(c2172.07,-350.69) 2174.03,-356.71 ccw(c2172.27,-351.31) 2177.95,-351.31 2177.95,-309.64 2177.95,-309.59 cw(c2184.18,-309.56) 2190.4,-309.65 2190.4,-309.81 2190.4,-350.1 ccw(c2196.61,-350.13) 2193.77,-355.64 ccw(c2196.47,-350.39) 2202.35,-350.89 ; U1.A32@2192.15,-2.67 2226.35,-36.88 ccw(c2242.09,-21.14) 2242.09,-43.4 2261.96,-43.4 cw(c2261.94,-64.22) 2276.7,-49.53 2294.43,-67.25 cw(c2287.36,-74.33) 2297.36,-74.33 2297.36,-80.22 cw(c2291.9,-80.22) 2295.77,-84.06 ; 2202.37,-350.58 2202.37,-325.18 ; 2202.37,-325.15 cw(c2208.59,-325.18) 2214.82,-325.23 ; 2214.82,-352.5 ccw(c2220.74,-352.5) 2220.7,-358.42 ccw(c2220.82,-352.22) 2227.02,-352.27 2227.02,-308.96 cw(c2233.03,-308.96) 2233.03,-302.95 2240.43,-302.95 ccw(c2240.43,-298.59) 2244.79,-298.59 R105.2@2244.79,-268.42 2237.89,-261.52 2237.89,-257.8 2230.97,-250.87 ; 2214.82,-352.47 2214.82,-325.27 ; 2220.31,-89.36 2210.67,-89.36 cw(c2210.67,-82.92) 2204.24,-82.92 2204.24,-61.24 cw(c2210.5,-61.24) 2210.5,-54.98 2220.66,-54.98 cw(c2220.66,-61.13) 2226.81,-61.13 2226.81,-73.28 ccw(c2232.96,-73.28) 2239.11,-73.28 2239.11,-61.13 cw(c2245.26,-61.13) 2251.41,-61.13 2251.41,-73.12 ccw(c2257.56,-73.12) 2263.71,-73.12 2263.71,-70.97 cw(c2269.86,-70.97) 2276.01,-70.97 2276.01,-78.14 ccw(c2283.54,-78.14) 2283.54,-85.67 2291.9,-85.67 ccw(c2291.9,-80.22) 2295.75,-84.08 ; 2220.37,-89.36 cw(c2220.19,-97.4) 2228.23,-97.4 2228.23,-244.27 ccw(c2237.57,-244.27) 2230.96,-250.86
  Bottom Layer w4.2: v1@2156.29,-315.8 U3.A3@2156.29,-302.95
eMMC_DATA1: U1.B27 U3.A4 | length 938.5
  Top Layer w4.2: U1.B27@2236.7,64.14 2236.7,58.18 2236.87,52.67 ccw(c2247.83,53) 2240.05,45.26 2328.93,-43.61 ccw(c2342.96,-29.59) 2341.48,-49.37 ccw(c2342.96,-29.59) 2342.95,-49.42 2433.89,-49.42 2455.51,-49.42 cw(c2455.51,-55.41) 2461.5,-55.41 v1(2461.5,-69.14)
  Bottom Layer w4.2: U3.A4@2175.96,-302.93 2175.96,-323.08 ccw(c2187.04,-323.08) 2187.04,-334.17 2379.07,-334.17 cw(c2379.07,-340.27) 2385.17,-340.27 2385.17,-349.73 ccw(c2391.27,-349.73) 2397.37,-349.73 2397.37,-338.42 cw(c2403.47,-338.42) 2409.57,-338.42 2409.57,-349.73 ccw(c2415.67,-349.73) 2421.77,-349.73 2421.77,-340.27 cw(c2427.87,-340.27) 2427.87,-334.17 2450.63,-334.17 ccw(c2450.63,-323.29) 2461.5,-323.29 v1(2461.5,-69.14)
eMMC_DATA2: U1.B32 U3.A5 | length 860.4
  Top Layer w4.2: U1.B32@2181.02,8.46 2192.31,8.3 cw(c2192.15,-2.67) 2199.64,5.35 cw(c2192.15,-2.67) 2200.16,4.83 ccw(c2203.13,7.66) 2200.2,4.78 2229.41,-24.42 ccw(c2242.82,-11.01) 2242.82,-29.98 v3(2249.86,-29.98)
  Signal L1 w4.7: v3(2249.86,-29.98) 2290.57,10.74 cw(c2297.32,4) 2297.34,13.54 cw(c2297.32,3.84) 2304.2,10.68 2304.24,10.64 2350.46,-35.59 ; v1(2304.18,-315.82) 2313.59,-305.8 cw(c2323.14,-314.77) 2323.12,-301.67 ; 2323.16,-301.67 2347.95,-301.67 ccw(c2347.95,-291.79) 2357.84,-291.79 2357.84,-280.19 ccw(c2348.55,-280.19) 2348.55,-270.9 2337.13,-270.9 cw(c2337.13,-262.5) 2337.13,-254.1 2349.26,-254.1 ccw(c2349.26,-245.7) 2349.26,-237.3 2335.36,-237.3 cw(c2335.36,-228.9) 2335.36,-220.5 2349.26,-220.5 ccw(c2349.26,-212.1) 2349.26,-203.7 2342.21,-203.7 cw(c2342.21,-195.3) 2342.21,-186.9 2349.57,-186.9 ccw(c2349.57,-178.5) 2349.57,-170.1 2340.44,-170.1 cw(c2340.44,-161.7) 2340.44,-153.3 2349.31,-153.3 ccw(c2349.31,-144.9) 2349.31,-136.5 2340.44,-136.5 cw(c2340.44,-128.1) 2340.44,-119.7 2349.06,-119.7 ccw(c2349.06,-111.3) 2357.46,-111.3 2357.46,-52.45 ; 2350.5,-35.62 cw(c2333.7,-52.42) 2357.46,-52.4
  Bottom Layer w4.2: U3.A5@2195.64,-302.93 2195.64,-308.92 ccw(c2202.79,-308.92) 2202.79,-316.07 v1@2303.93,-316.07
eMMC_DATA3: U1.B29 U3.B2 | length 865.6
  Top Layer w4.2: U1.B29@2214.43,41.87 2225.72,41.7 cw(c2225.56,30.73) 2233.04,38.76 cw(c2225.56,30.73) 2233.28,38.53 2233.85,38.53 2327.97,-55.59 ccw(c2343.61,-39.93) 2343.61,-62.06 v3(2425.51,-62.06)
  Signal L1 w4.7: v1@2136.32,-283.51 2136.32,-314.24 ccw(c2169.72,-314.24) 2169.72,-347.64 2398.22,-347.64 ccw(c2398.22,-320.35) 2425.51,-320.35 v3@2425.51,-61.94
  other v1: 2136.59,-283.24
eMMC_DATA4: U1.B33 U3.B3 | length 957.9
  Top Layer w4.2: 2096.3,-144.46 cw(c2096.3,-137.34) 2090.39,-141.31 cw(c2093.89,-138.99) 2089.71,-138.63 ccw(c2077.76,-137.48) 2089.76,-137.61 2089.76,-125.45 cw(c2096.21,-125.45) 2096.21,-119 2138.05,-119 ccw(c2138.05,-106.4) 2146.96,-115.31 2168.11,-94.17 cw(c2176.06,-102.09) 2176.06,-90.86 2184.04,-90.86 ccw(c2184.04,-83.5) 2191.41,-83.5 2191.41,-69.72 ccw(c2185.3,-69.72) 2190.82,-67.11 ccw(c2185.3,-69.72) 2185.3,-63.62 cw(c2185.3,-58.52) 2185.3,-53.42 2187.04,-53.42 ccw(c2187.01,-48.18) 2187.09,-42.94 2184.67,-42.94 cw(c2184.67,-38.78) 2183.99,-42.88 cw(c2184.67,-38.78) 2182.05,-42.01 cw(c2184.67,-38.78) 2181.44,-41.4 cw(c2184.67,-38.78) 2180.51,-38.78 ccw(c2154.04,-40.25) 2174.35,-23.21 ccw(c2171.15,-25.94) 2174.16,-23 cw(c2184.91,-12.5) 2169.88,-12.5 U1.B33@2169.88,-2.67 ; 2096.33,-144.46 2116.71,-144.46 cw(c2116.71,-150.61) 2116.71,-156.76 ; 2122.86,-175.21 cw(c2116.71,-175.21) 2116.71,-181.36 ; 2122.86,-150.61 cw(c2116.71,-150.61) 2116.71,-156.76 ; 2136.9,-346.26 cw(c2130.72,-346.18) 2130.62,-352.36 cw(c2130.72,-346.34) 2124.7,-346.26 2125.12,-304.07 2125.13,-303.97 ccw(c2118.91,-303.85) 2112.7,-303.84 2112.7,-303.93 2112.26,-345.66 cw(c2105.96,-345.32) 2099.65,-345.26 2100.49,-263.67 2100.49,-261.03 2100.49,-248.73 ccw(c2094.39,-248.73) 2094.39,-242.63 2052.34,-242.63 cw(c2052.34,-236.53) 2052.34,-230.43 2094.39,-230.43 ccw(c2094.39,-224.33) 2100.49,-224.33 2100.49,-210.03 2100.49,-200.45 ccw(c2093.71,-200.45) 2093.71,-193.66 2081.3,-193.66 cw(c2081.3,-187.51) 2081.3,-181.36 2116.71,-181.36 ; 2136.9,-346.23 2137.34,-304.72 ; 2137.37,-304.7 cw(c2142.2,-304.72) 2142.2,-299.88 2150.71,-299.88 ccw(c2150.71,-293.75) 2156.84,-293.75 2156.84,-283.81 v1(2156.27,-283.24) ; 2116.71,-181.36 ccw(c2116.71,-175.21) 2116.71,-169.06 2081.3,-169.06 cw(c2081.3,-162.91) 2081.3,-156.76 2116.71,-156.76
eMMC_DATA5: U1.A30 U3.B4 | length 862.9
  Top Layer w4.2: U1.A30@2214.43,19.6 2223.29,19.59 2320.97,-78.08 ccw(c2331.57,-67.48) 2331.57,-82.48 2394.52,-82.48 v3(2395.02,-82.98)
  Signal L1 w4.7: 2175.96,-319.66 ccw(c2191.71,-319.66) 2191.71,-335.41 2323.57,-335.41 ccw(c2323.57,-329.06) 2329.92,-329.06 2329.92,-324.39 cw(c2336.27,-324.39) 2342.62,-324.39 2342.62,-329.09 ccw(c2348.97,-329.09) 2355.32,-329.09 cw(c2361.67,-329.06) 2368.02,-329.06 ccw(c2374.37,-329.06) 2374.37,-335.41 2398.35,-335.41 ccw(c2398.35,-321.4) 2412.36,-321.4 2412.36,-58.01 ccw(c2406.82,-58.01) 2406.82,-52.48 2400.04,-52.48 ccw(c2400.04,-57.49) 2395.02,-57.49 v3(2395.02,-82.98) ; 2175.96,-319.62 v1(2175.96,-283.24)
eMMC_DATA6: U1.B30 U3.B5 | length 845.3
  Top Layer w4.2: U1.B30@2203.29,30.73 2203.29,24.78 2203.46,19.26 ccw(c2216.35,19.26) 2207.23,10.15 2224.17,-6.79 ccw(c2235.42,4.47) v3(2235.42,-11.44)
  Signal L1 w4.7: v1(2195.64,-283.24) 2195.64,-309.33 ccw(c2202.38,-309.33) 2202.38,-316.07 2248.66,-316.07 ccw(c2248.66,-286.87) 2269.28,-307.54 ; v3(2235.42,-11.44) 2222.24,-24.62 ccw(c2228.09,-30.49) 2219.8,-30.49 2219.8,-30.98 ccw(c2229.8,-30.98) 2222.73,-38.06 2236.8,-52.12 ccw(c2244.76,-44.23) 2252.85,-51.99 2253.05,-51.78 2285.85,-18.98 cw(c2292.22,-25.37) 2298.34,-18.74 2303.88,-24.29 cw(c2298.33,-29.85) 2304.02,-35.27 2303.97,-35.32 2264.39,-74.89 ccw(c2270.36,-80.81) 2276.3,-86.75 2315.97,-47.08 cw(c2321.09,-52.19) 2326.2,-47.06 2331.46,-52.32 cw(c2327.38,-56.33) 2331.41,-60.38 2310.3,-81.5 ccw(c2326.82,-98.01) 2303.46,-98.01 2303.46,-106.42 cw(c2292.53,-106.42) 2292.53,-117.35 2285.64,-117.35 ccw(c2285.64,-124.32) 2285.64,-131.29 2292.35,-131.29 cw(c2292.35,-138.98) 2300.04,-138.98 2300.04,-141.45 cw(c2293.81,-141.45) 2294.18,-147.67 2293.22,-147.9 ccw(c2294.31,-152.47) 2290.82,-149.32 ccw(c2297.66,-155.34) 2288.55,-155.39 ccw(c2296.63,-155.34) 2296.63,-163.42 2306.03,-163.42 cw(c2306.03,-171.82) 2306.03,-180.22 2301.03,-180.22 ccw(c2301.01,-189.18) 2301.07,-198.15 cw(c2301.07,-204.26) 2307.18,-204.26 2307.18,-283.9 cw(c2292.11,-283.9) 2292.11,-298.97 2289.94,-298.97 ccw(c2289.94,-328.16) 2269.32,-307.5
eMMC_DATA7: U1.A33 U3.B6 | length 840.9
  Top Layer w4.2: U1.A33@2181.02,-13.81 2181.17,-13.82 2192.22,-24.86 v3(2192.37,-24.86)
  Signal L1 w4.7: v3(2192.37,-24.86) 2192.37,-36.56 ccw(c2203.6,-36.53) 2195.68,-44.5 2195.72,-44.54 2200.23,-49.05 2204.73,-53.55 cw(c2199.06,-59.28) 2204.74,-64.99 2198.59,-71.14 ccw(c2204.53,-77.08) 2210.47,-83.02 2218.24,-75.24 cw(c2224.18,-81.18) 2230.12,-87.12 ccw(c2234.59,-93.67) 2240.21,-99.25 cw(c2246.24,-105.29) 2252.27,-99.25 cw(c2230.3,-121.22) 2261.37,-121.17 2261.37,-121.23 cw(c2254.28,-121.22) 2254.28,-128.32 ; v1(2215.33,-283.24) 2283.07,-283.24 ccw(c2283.07,-272.98) 2283.07,-262.71 2204.89,-262.71 cw(c2204.89,-239.35) 2188.37,-255.87 2180.77,-248.27 ccw(c2166.32,-262.72) 2166.32,-242.28 2140.07,-242.28 cw(c2140.07,-233.41) 2131.2,-233.48 2131.2,-233.35 cw(c2138.59,-233.29) 2138.59,-225.9 2207.38,-225.9 cw(c2207.38,-233.85) 2215.33,-233.85 2215.33,-237.3 ccw(c2223.73,-237.3) 2223.73,-245.7 2281.79,-245.7 ccw(c2281.79,-235.44) 2281.79,-225.17 2270.85,-225.17 cw(c2270.85,-217.03) 2262.71,-217.03 2262.71,-148.12 ccw(c2255.21,-148.12) 2255.21,-140.62 2232.81,-140.62 cw(c2232.81,-134.47) 2232.81,-128.32 2254.25,-128.32
eMMC_DATA_STROBE: R56.1 U1.1A16 | length 938.3
  Bottom Layer w4.2: v1(2196.33,72.49) 2199.75,69.07 ccw(c2217.24,86.56) 2217.24,61.82 2314.33,61.82 cw(c2314.33,55.72) 2320.43,55.72 2320.43,43.03 ccw(c2326.53,43.03) 2332.63,43.03 2332.63,53.26 cw(c2338.73,53.26) 2344.83,53.26 2344.83,43.03 ccw(c2350.93,43.03) 2357.03,43.03 2357.03,53.26 cw(c2363.13,53.26) 2369.23,53.26 2369.23,43.03 ccw(c2375.33,43.03) 2381.43,43.03 2381.43,53.26 cw(c2387.53,53.26) 2393.63,53.26 2393.63,43.03 ccw(c2399.73,43.03) 2405.83,43.03 2405.83,52.79 cw(c2411.64,52.79) 2411.64,58.6 2586.42,58.6 cw(c2586.42,51.99) 2593.04,51.99 2593.04,-61.84 cw(c2572.8,-61.84) 2587.11,-76.14 ccw(c2600.8,-89.83) 2581.44,-89.83 2581.44,-140.76 cw(c2575.48,-140.76) 2575.48,-146.72 2547.92,-146.72 cw(c2547.92,-139.6) 2540.8,-139.6 2540.8,-122.13 ccw(c2532.57,-122.13) 2532.57,-113.9 2486.34,-113.9 ccw(c2486.34,-120.89) 2479.35,-120.89 2479.35,-139.26 ccw(c2486.57,-139.26) 2486.57,-146.47 v1(2520.35,-146.47)
eMMC_RSTN: R28.1 U1.1B16 | length 428.3
  Top Layer w10: v3(2010.69,-187.44) v3@2010.94,-187.18 ; R28.1@2010.94,-174.59 R28.1@2011.19,-174.34
  Top Layer w15: v3@2010.94,-187.18 R28.1@2010.94,-174.59
  Signal L1 w4.7: v3(2010.69,-187.44) 2036.17,-187.44 ccw(c2036.17,-167.72) 2055.89,-167.72 2055.89,-121.14 cw(c2068.76,-121.14) 2068.76,-108.27 2149.94,-108.27 ; 2149.99,-108.27 ccw(c2149.99,-96.76) 2161.49,-96.42 2161.48,-96.04 2161.48,0.51 ; 2161.48,0.56 cw(c2181.85,0.52) 2167.47,14.95 2171.52,19 ccw(c2155.16,35.27) 2178.23,35.35 ; 2178.23,35.36 v1(2178.23,90.59)
FLASH_VOL_SEL: R22.2 U1.AF38 | length 330.3
  Top Layer w4: R22.2@1660.47,337.46 1637.94,314.94 ccw(c1646.96,305.89) 1634.19,305.89 1634.19,282.63 ccw(c1642,282.59) 1642.13,274.77 1642.32,274.78 1720.11,274.78 cw(c1720.11,225.16) 1747.3,266.66 v3(1756.36,260.73) ; v3(1808.41,208.62) 1809.09,209.3 1845.21,209.3 1846.56,209.3 U1.AF38@1846.95,208.9
  Signal L1 w10: v3(1756.36,260.73) 1789.71,260.73 cw(c1789.71,242.03) 1808.41,242.03 v3(1808.41,208.62)